# Altium PCB Brainy Modul.PcbDoc (part 1 of 2)
Units mm, origin at the board's own origin, x right, y up, seen from the top; angles counter-clockwise.
Board outline 62.64 x 89.24 mm, 2 copper layers (Top Layer, Bottom Layer), stack 1.569 mm thick; 42 components, 69 nets, 310 pads, 80 vias.
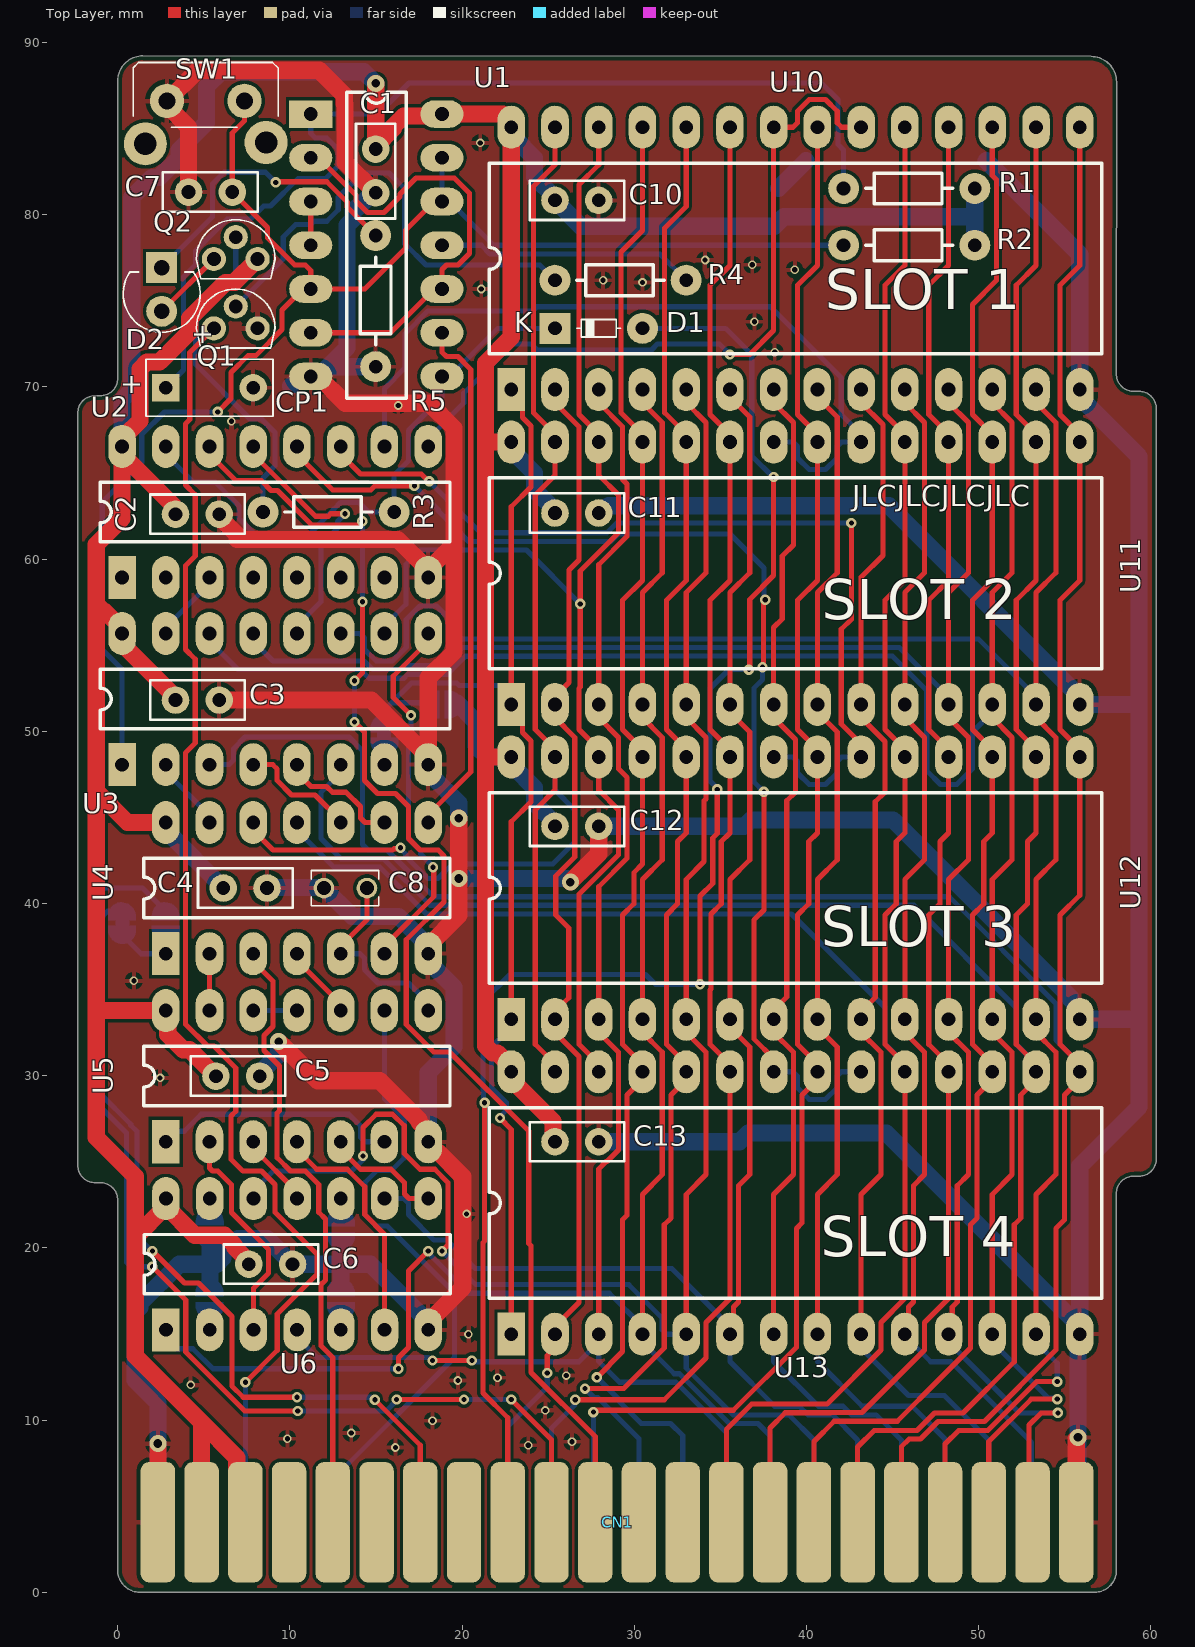
[diagram p0: Top Layer view]
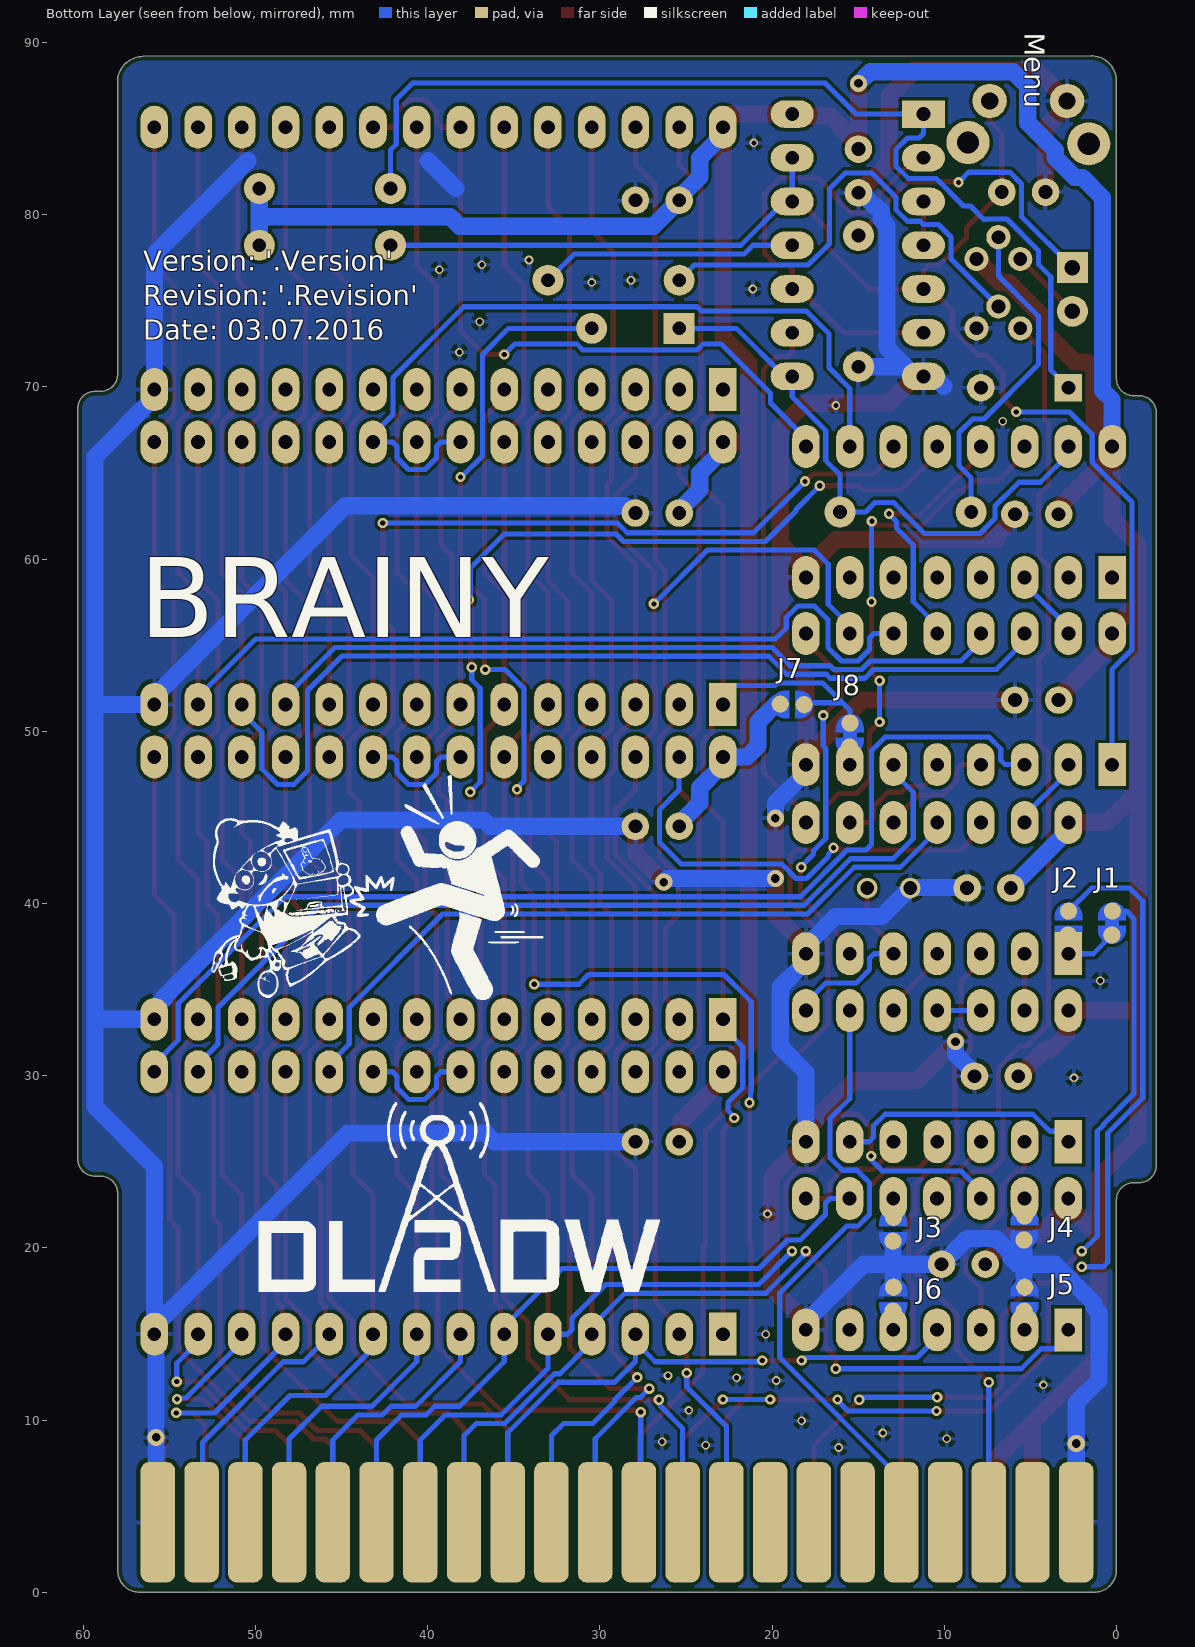
[diagram p1: Bottom Layer view, seen from below]
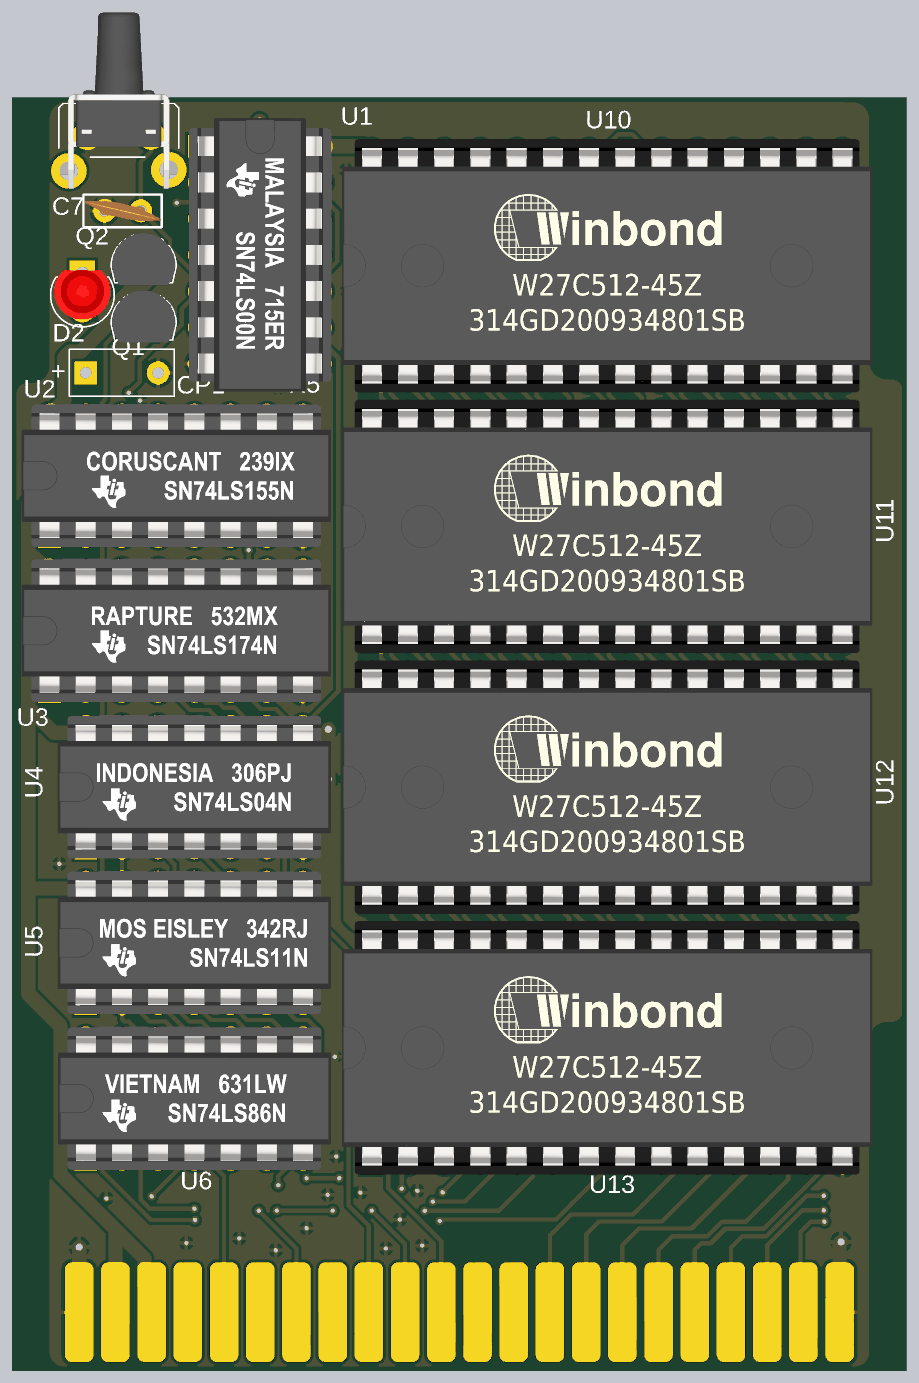
[diagram p2: 3D render of the assembled board from above, using the file's embedded part models]

## Layer stack, top to bottom
Top Solder: solder mask 0.0254, SM-001, Dk 4
Top Layer: signal copper 0.035
Dielectric 1: core 1.4986, Core-043, Dk 4.3
Bottom Layer: signal copper 0.035
Bottom Solder: solder mask 0.0254, SM-001, Dk 4

## Board outline
0,1.29 0,22.785 ccw(c-0.998,22.787) -0.997,23.785 -1.315,23.785 cw(c-1.315,24.785) -2.315,24.785 -2.315,68.494 cw(c-1.315,68.494) -1.315,69.494 -0.997,69.494 ccw(c-0.997,70.491) 0,70.491 0,87.766 cw(c1.47,87.766) 1.47,89.236 56.54,89.197 cw(c56.54,87.724) 58.014,87.724 58.008,70.748 ccw(c59.008,70.748) 59.008,69.748 59.327,69.748 cw(c59.327,68.748) 60.327,68.748 60.327,25.162 cw(c59.327,25.162) 59.327,24.162 59.008,24.162 ccw(c59.008,23.162) 58.008,23.162 58.008,1.265 cw(c56.744,1.264) 56.744,0 1.29,0 cw(c1.29,1.29)

## Design rules (kind name [scope] priority, off if disabled: settings)
BoardOutlineClearance [All] p1: gap=0.254 ignorepadtopadclearanceinfootprint=FALSE
Clearance [All] p1: gap=0.2 ignorepadtopadclearanceinfootprint=TRUE
ComponentClearance ComponentClearance_Sheet [HasFootprint('PCB Title Block DIN A4')] p1: gap=0 collisioncheckmode=3 verticalgap=0 showdistances=FALSE
ComponentClearance [All] p2: gap=0 collisioncheckmode=3 verticalgap=0 showdistances=FALSE
MinimumSolderMaskSliver [All] p1: minsoldermaskwidth=0.103
PolygonConnect [All] p1: connectstyle=Relief reliefconductorwidth=0.254 reliefentries=4 polygonreliefangle="90 Angle" airgapwidth=0.254
RoutingVias RoutingVias_Power [(InNet('VCC') OR InNet('GND') OR InNet('+5V'))] p1: holewidth=0.5 width=1 viastyle="Through Hole" minholewidth=0.5 minwidth=1 maxholewidth=0.8 maxwidth=1.5
RoutingVias [All] p2: holewidth=0.3 width=0.6 viastyle="Through Hole" minholewidth=0.3 minwidth=0.6 maxholewidth=0.5 maxwidth=0.8
SMDNeckDown [All] p1: percent=100.000
SilkToSilkClearance [All] p1: silktosilkclearance=0
SilkToSolderMaskClearance [IsPad] p1: minsilkscreentomaskgap=0 clearancetoexposedcopper=TRUE
SolderMaskExpansion [All] p1: expansion=0.038 istentingtop=FALSE
UnRoutedNet [All] p1: checkbadconnections=TRUE
Width Width_Power [(InNet('VCC') OR InNet('GND') OR InNet('+5V'))] p1: maxlimit=1 minlimit=0.5 preferedwidth=1 checkconnectedcopper=TRUE
Width [All] p2: maxlimit=0.5 minlimit=0.3 preferedwidth=0.3
25 further rules are at their usual default settings.

## Components (designator, comment, footprint, x,y, rotation, side; value= is the part's Value field where it differs from the comment)
C1 "100nF" "CAP Disc 100nF P2.54mm D5.5mm T3mm" 14.986,81.276 r90 top
C2 "100nF" "CAP Disc 100nF P2.54mm D5.5mm T3mm" 5.9,62.611 r180 top
C3 "100nF" "CAP Disc 100nF P2.54mm D5.5mm T3mm" 5.9,51.816 r180 top
C4 "100nF" "CAP Disc 100nF P2.54mm D5.5mm T3mm" 8.674,40.9 r180 top
C5 "100nF" "CAP Disc 100nF P2.54mm D5.5mm T3mm" 8.247,29.974 r180 top
C6 "100nF" "CAP Disc 100nF P2.54mm D5.5mm T3mm" 10.16,19.05 r180 top (schematic designator c6)
C7 "100nF" "CAP Disc 100nF P2.54mm D5.5mm T3mm" 4.119,81.318 r0 top
C8 "220pF" "KERKO 220P 63V RM2.5mm" 11.978,40.894 r90 top
C10 "100nF" "CAP Disc 100nF P2.54mm D5.5mm T3mm" 27.94,80.842 r180 top
C11 "100nF" "CAP Disc 100nF P2.54mm D5.5mm T3mm" 27.94,62.68 r180 top
C12 "100nF" "CAP Disc 100nF P2.54mm D5.5mm T3mm" 27.94,44.482 r180 top
C13 "100nF" "CAP Disc 100nF P2.54mm D5.5mm T3mm" 27.94,26.162 r180 top
CN1 "C64 Expansion Port" "C64 Expansion Port EDGE Connector" 2.337,4.064 r0 top locked
CP1 "10µF" "CAP TAN 10µF T378E106K025AS P5.08mm" 2.794,69.956 r180 top
D1 "1N4148" "1N4148 P=5.08mm" 25.4,73.406 r0 top
D2 "LED Red" "LED 3mm Red Straight" 2.559,76.937 r0 top
J1 "Solder Jumper closed" "Solder Jumper Closed" 0.254,38.862 r270 bottom net-tie
J2 "Solder Jumper Open" "Solder Jumper Open Variant 2" 2.794,38.862 r270 bottom
J3 "Solder Jumper Open" "Solder Jumper Open Variant 2" 12.963,21.082 r90 bottom
J4 "Solder Jumper Open" "Solder Jumper Open Variant 2" 5.35,21.149 r90 bottom
J5 "Solder Jumper Open" "Solder Jumper Open Variant 2" 5.343,17.018 r270 bottom
J6 "Solder Jumper Open" "Solder Jumper Open Variant 2" 12.963,17.018 r270 bottom
J7 "Solder Jumper Open" "Solder Jumper Open Variant 2" 18.834,51.562 r0 bottom
J8 "Solder Jumper closed" "Solder Jumper Closed" 15.494,49.784 r90 bottom net-tie
Q1 "BC547C" BC547C 5.588,73.406 r0 top
Q2 "BC557C" BC557C 5.588,77.432 r0 top
R1 "10k" "10 kOhm R Axial DIN0207 L6.3mm D2.5mm P7.62mm Horizontal" 49.784,81.534 r180 top
R2 "10k" "10 kOhm R Axial DIN0207 L6.3mm D2.5mm P7.62mm Horizontal" 49.784,78.232 r180 top
R3 "10k" "10 kOhm R Axial DIN0207 L6.3mm D2.5mm P7.62mm Horizontal" 16.06,62.738 r180 top
R4 "22k" "22 kOhm R Axial DIN0207 L6.3mm D2.5mm P7.62mm Horizontal" 33.02,76.2 r180 top
R5 "390" "390 Ohm R Axial DIN0207 L6.3mm D2.5mm P7.62mm Horizontal" 14.986,71.178 r90 top
SW1 "Menu" "Tactile Switch Push Button Right Angle L=8.35mm" 2.866,86.614 r180 top
U1 "SN74LS00N" "SN74LS00N with Socket" 11.214,85.852 r270 top
U2 "SN74LS155N" "SN74LS155N with Socket" 0.254,58.928 r0 top
U3 "SN74LS174N" "SN74LS174N with Socket" 0.254,48.064 r0 top
U4 "SN74LS04N" "SN74LS04N with Socket" 2.794,37.084 r0 top
U5 "SN74LS11N" "SN74LS11N with Socket" 2.794,26.162 r0 top
U6 "SN74LS86AN" "SN74LS86N with Socket" 2.803,15.24 r90 top locked
U10 "SLOT 1" "Winbond W27C512-45Z DIP-28 with Socket" 22.86,69.85 r90 top
U11 "SLOT 2" "Winbond W27C512-45Z DIP-28 with Socket" 22.86,51.562 r90 top
U12 "SLOT 3" "Winbond W27C512-45Z DIP-28 with Socket" 22.86,33.274 r90 top
U13 "SLOT 4" "Winbond W27C512-45Z DIP-28 with Socket" 22.86,14.986 r90 top

## Footprints (in the part's own frame and the unit in brackets; to place one, negate y for a bottom-side part, rotate by r counter-clockwise, add the part's x,y. Pads: shape width x height; smd on the part's side, far side on the other; paste and mask are expansions set on the pad)
"1N4148 P=5.08mm" [mm]
  rect 1.8x1.8 hole 0.8: 1(0,0)
  round 1.8 hole 0.8: 2(5.08,0)
  silkscreen extent 1.27,-0.51 3.81,0.51, body extent -0.25,-0.86 5.33,0.86, height 2.02
"10 kOhm R Axial DIN0207 L6.3mm D2.5mm P7.62mm Horizontal" [mm]
  round 1.8 hole 0.8: 1(0,0) 2(7.62,0)
  silkscreen extent 1.27,-0.89 6.35,0.89, body extent -0.27,-1.14 7.9,1.14, height 2.44
"22 kOhm R Axial DIN0207 L6.3mm D2.5mm P7.62mm Horizontal" [mm]
  round 1.8 hole 0.8: 1(0,0) 2(7.62,0)
  silkscreen extent 1.27,-0.89 6.35,0.89, body extent -0.27,-1.14 7.9,1.14, height 2.44
"390 Ohm R Axial DIN0207 L6.3mm D2.5mm P7.62mm Horizontal" [mm]
  round 1.8 hole 0.8: 1(0,0) 2(7.62,0)
  silkscreen extent 1.27,-0.89 6.35,0.89, body extent -0.27,-1.14 7.9,1.14, height 2.44
BC547C [mm]
  round 1.4 hole 0.8: 1(0,0) 2(1.27,1.27) 3(2.54,0)
  silkscreen extent -1.02,-1.14 3.56,2.29, body extent -0.97,-1.34 3.51,2.35, height 7.52
BC557C [mm]
  round 1.4 hole 0.8: 1(0,0) 2(1.27,1.27) 3(2.54,0)
  silkscreen extent -1.02,-1.14 3.56,2.29, body extent -0.97,-1.34 3.51,2.35, height 7.52
"C64 Expansion Port EDGE Connector" [mm] "C64 Expansion Port EDGE Connector"
  rrect50% 2x7 smd paste-1: 1(0,0) 2(2.54,0) 3(5.08,0) 4(7.62,0) 5(10.16,0) 6(12.7,0) 7(15.24,0) 8(17.78,0) 9(20.32,0) 10(22.86,0) 11(25.4,0) 12(27.94,0) 13(30.48,0) 14(33.02,0) 15(35.56,0) 16(38.1,0) 17(40.64,0) 18(43.18,0) 19(45.72,0) 20(48.26,0) 21(50.8,0) 22(53.34,0)
  rrect50% 2x7 smd far side paste-1: A(0,0) B(2.54,0) C(5.08,0) D(7.62,0) E(10.16,0) F(12.7,0) H(15.24,0) J(17.78,0) K(20.32,0) L(22.86,0) M(25.4,0) N(27.94,0) P(30.48,0) R(33.02,0) S(35.56,0) T(38.1,0) U(40.64,0) V(43.18,0) W(45.72,0) X(48.26,0) Y(50.8,0) Z(53.34,0)
"CAP Disc 100nF P2.54mm D5.5mm T3mm" [mm]
  round 1.6 hole 0.8: 1(0,0) 2(2.54,0)
  silkscreen extent -1.49,-1.14 4.01,1.14, body extent -1.49,-0.73 4.01,0.73, height 5.87
"CAP TAN 10µF T378E106K025AS P5.08mm" [mm]
  rect 1.6x1.6 hole 0.8: 1(0,0)
  round 1.6 hole 0.8: 2(-5.08,0)
  silkscreen extent -6.22,-1.65 1.14,1.65, body extent -5.9,-1.66 0.82,1.66, height 8.17
"KERKO 220P 63V RM2.5mm" [mm]
  round 1.2 hole 0.8: 1(0,0) 2(0,-2.5)
  silkscreen extent -1.03,-3.19 1.03,0.74, body extent -1.03,-3.19 1.03,0.74, height 4.75
"LED 3mm Red Straight" [mm]
  rect 1.8x1.8 hole 0.9: 1(0,0)
  round 1.8 hole 0.9: 2(0,-2.54)
  silkscreen extent -2.24,-3.76 2.24,-0.25, body extent -2,-3.27 2,0.23, height 6
"SN74LS00N with Socket" [mm]
  rect 1.6x2.5 hole 0.8: 1(0,0)
  oval 1.6x2.5 hole 0.8: 2(2.54,0) 3(5.08,0) 4(7.62,0) 5(10.16,0) 6(12.7,0) 7(15.24,0) 8(15.24,7.62) 9(12.7,7.62) 10(10.16,7.62) 11(7.62,7.62) 12(5.08,7.62) 13(2.54,7.62) 14(0,7.62)
  silkscreen extent -1.27,2.08 16.51,5.54, body extent -1.97,-1.19 17.21,8.86, height 7.91
"SN74LS04N with Socket" [mm]
  rect 1.6x2.5 hole 0.8: 1(0,0)
  oval 1.6x2.5 hole 0.8: 2(2.54,0) 3(5.08,0) 4(7.62,0) 5(10.16,0) 6(12.7,0) 7(15.24,0) 8(15.24,7.62) 9(12.7,7.62) 10(10.16,7.62) 11(7.62,7.62) 12(5.08,7.62) 13(2.54,7.62) 14(0,7.62)
  silkscreen extent -1.27,2.08 16.51,5.54, body extent -1.97,-1.19 17.21,8.86, height 7.91
"SN74LS11N with Socket" [mm]
  rect 1.6x2.5 hole 0.8: 1(0,0)
  oval 1.6x2.5 hole 0.8: 2(2.54,0) 3(5.08,0) 4(7.62,0) 5(10.16,0) 6(12.7,0) 7(15.24,0) 8(15.24,7.62) 9(12.7,7.62) 10(10.16,7.62) 11(7.62,7.62) 12(5.08,7.62) 13(2.54,7.62) 14(0,7.62)
  silkscreen extent -1.27,2.08 16.51,5.54, body extent -1.97,-1.19 17.21,8.86, height 7.91
"SN74LS86N with Socket" [mm]
  rect 2.5x1.6 hole 0.8: 1(0,0)
  oval 2.5x1.6 hole 0.8: 2(0,-2.54) 3(0,-5.08) 4(0,-7.62) 5(0,-10.16) 6(0,-12.7) 7(0,-15.24) 8(7.62,-15.24) 9(7.62,-12.7) 10(7.62,-10.16) 11(7.62,-7.62) 12(7.62,-5.08) 13(7.62,-2.54) 14(7.62,0)
  silkscreen extent 2.08,-16.51 5.54,1.27, body extent -1.19,-17.21 8.86,1.97, height 7.91
"SN74LS155N with Socket" [mm]
  rect 1.6x2.5 hole 0.8: 1(0,0)
  oval 1.6x2.5 hole 0.8: 2(2.54,0) 3(5.08,0) 4(7.62,0) 5(10.16,0) 6(12.7,0) 7(15.24,0) 8(17.78,0) 9(17.78,7.62) 10(15.24,7.62) 11(12.7,7.62) 12(10.16,7.62) 13(7.62,7.62) 14(5.08,7.62) 15(2.54,7.62) 16(0,7.62)
  silkscreen extent -1.27,2.08 19.05,5.54, body extent -1.97,-1.19 19.75,8.86, height 7.81
"SN74LS174N with Socket" [mm]
  rect 1.6x2.5 hole 0.8: 1(0,0)
  oval 1.6x2.5 hole 0.8: 2(2.54,0) 3(5.08,0) 4(7.62,0) 5(10.16,0) 6(12.7,0) 7(15.24,0) 8(17.78,0) 9(17.78,7.62) 10(15.24,7.62) 11(12.7,7.62) 12(10.16,7.62) 13(7.62,7.62) 14(5.08,7.62) 15(2.54,7.62) 16(0,7.62)
  silkscreen extent -1.27,2.08 19.05,5.54, body extent -1.97,-1.19 19.75,8.86, height 7.81
"Solder Jumper Closed" [mm]
  round 1 smd paste-1 mask-1: 1(-0.695,0.016) 2(0.695,-0.016)
  Top Layer region: -0.165,-0.804 -0.378,-0.804 -0.695,-0.741 -0.964,-0.561 -1.143,-0.292 -1.206,0.025 -1.206,0.025 -1.147,0.323 -0.978,0.576 -0.725,0.745 -0.427,0.804 -0.427,0.804 -0.165,0.804
  Top Layer region: 0.165,0.804 0.378,0.804 0.695,0.741 0.964,0.561 1.143,0.292 1.207,-0.025 1.207,-0.025 1.147,-0.323 0.978,-0.576 0.725,-0.745 0.427,-0.804 0.427,-0.804 0.165,-0.804
  Top Layer region: 0.195,-0.406 -0.643,-0.406 -0.643,0.374 0.195,0.374
"Solder Jumper Open Variant 2" [mm]
  round 1 smd paste-1 mask-1: 1(-0.695,0.016) 2(0.695,-0.016)
  Top Layer region: 0.165,0.804 0.378,0.804 0.695,0.741 0.964,0.561 1.143,0.292 1.207,-0.025 1.207,-0.025 1.147,-0.323 0.978,-0.576 0.725,-0.745 0.427,-0.804 0.427,-0.804 0.165,-0.804
  Top Layer region: -0.165,-0.804 -0.378,-0.804 -0.695,-0.741 -0.964,-0.561 -1.143,-0.292 -1.206,0.025 -1.206,0.025 -1.147,0.323 -0.978,0.576 -0.725,0.745 -0.427,0.804 -0.427,0.804 -0.165,0.804
"Tactile Switch Push Button Right Angle L=8.35mm" [mm] "Tactile Switch SPST-NO Side Actuated Through Hole, Right Angle 1-1825027-1"
  round 2 hole 1: 1(0,0) 2(-4.5,0)
  round 2.5 hole 1.3: 3(1.255,2.49) 4(-5.755,2.413)
  silkscreen extent -6.45,-2.24 1.96,1.52, body extent -6.45,-8.61 1.96,3.75, height 7.06
"Winbond W27C512-45Z DIP-28 with Socket" [mm]
  rect 2.5x1.6 hole 0.8: 1(0,0)
  oval 2.5x1.6 hole 0.8: 2(0,-2.54) 3(0,-5.08) 4(0,-7.62) 5(0,-10.16) 6(0,-12.7) 7(0,-15.24) 8(0,-17.78) 9(0,-20.32) 10(0,-22.86) 11(0,-25.4) 12(0,-27.94) 13(0,-30.48) 14(0,-33.02) 15(15.24,-33.02) 16(15.24,-30.48) 17(15.24,-27.94) 18(15.24,-25.4) 19(15.24,-22.86) 20(15.24,-20.32) 21(15.24,-17.78) 22(15.24,-15.24) 23(15.24,-12.7) 24(15.24,-10.16) 25(15.24,-7.62) 26(15.24,-5.08) 27(15.24,-2.54) 28(15.24,0)
  silkscreen extent 2.08,-34.29 13.16,1.27, body extent -1.27,-35.11 16.51,2.1, height 8.64

## Part data
C1 C2 C3 C4 C5 C6 C7 C10 C11 C12 C13: library part CMP-Capacitors-Ceramic_Capacitors-00007-4, "Ceramic Disc Capacitors 100nF -20%~+80% 50V Through Hole,P=2.54mm RoHS", ComponentLink1URL=https://lcsc.com/product-detail/Others_Dersonic-CC1H104ZA1PD3F5O3000_C353909.html
C8: library part CMP-Capacitors-Ceramic_Capacitors-00015-1, "Keramischer Scheibenkondensator, bedrahtet. Für Printmontage, Rastermaß 2,5 mm.", Case/Package=Radial, Dielectric=C0G, Max Operating Temperature=125°C, Min Operating Temperature=-55°C, Package Quantity=3500, Tolerance=10%, Voltage Rating=63V, Capacitance=220pF, Height=5, Height - Seated (Max)=5mm, Lead Diameter=4mm, Lead Pitch=2.5mm, Lead/Base Style=Straight, Length=0.15inch, Mount="Through Hole", Number of Pins=2, Packaging="Tape and Reel", REACH SVHC="No SVHC", Termination=Radial, Thickness=2.2mm, Voltage Rating (DC)=63V, Width=4mm
CN1: library part CMP-Commodore-00008-4, "Expansion Port EDGE Connector for Interface Cards"
CP1: library part CMP-Capacitors-Tantalum_Capacitors-00001-5, "Tantalum Capacitors - Solid Leaded 25volts 10uF 10%", Capacitance=10uF, Case/Package=Molded, ESR (Equivalent Series Resistance)=2.5R, Leakage Current=3uA, Max Operating Temperature=125°C, Min Operating Temperature=-55°C, Tolerance=10%, Voltage Rating=25V, Depth=3.3mm, Dissipation Factor=6%, Height=3.3mm, Lead Pitch=5.08mm, Length=7.87mm, Packaging=Bulk, Polarity=Polar, Termination=Radial, Voltage Rating (DC)=25V, Width=5.84mm
D1: library part CMP-Diodes-00002-4, "NEXPERIA - 1N4148 - DIODE, 1N4148 AMMO-BOX 10K", Capacitance=4pF, Case/Package=SOD, Current=4A, Current Rating=200mA, Forward Voltage=1V, Max Operating Temperature=200°C, Max Power Dissipation=500mW, Max Repetitive Reverse Voltage (Vrrm)=100V, Min Operating Temperature=-65°C, Element Configuration=Single, Forward Current=200mA, Height=0.25inch, Lead Free="Lead Free", Length=2.5inch, Max Forward Surge Current (Ifsm)=4A, Number of Pins=2, Output Current=200mA, Packaging="Ammo Pack", Peak Non-Repetitive Surge Current=4A, Polarity=Standard, Radiation Hardening=No, REACH SVHC="No SVHC", Reverse Recovery Time=4ns, Termination=Axial, Voltage=100V, Voltage Rating (DC)=100V, Weight=0.01lb, Width=0.25inch
D2: library part CMP-LEDs-00000-4, "WURTH ELEKTRONIK   151033RS03000   LED, 3MM,  RED, 2600MCD, 621NM", Case/Package=Radial, Color=Red, Forward Current=30mA, Forward Voltage=2V, Max Operating Temperature=85°C, Min Operating Temperature=-40°C, Package Quantity=1, Test Current=20mA, Dominant Wavelength=621nm, Height=5.55mm, Lens Size=3mm, Lens Style=Clear,Circular,Round, Luminous Intensity=2600mcd, Mount="Through Hole", Packaging=Bulk, REACH SVHC=Unknown, Viewing Angle=30°, Wavelength=621nm
J1 J8: library part CMP-Mechanicals-00017-7, "Solder Jumper Closed"
J2 J3 J4 J5 J6 J7: library part CMP-Mechanicals-00016-14
Q1: library part CMP-Transistors-00002-1, "BC547C Diotec Bipolar NPN Transistor 45V", Case/Package=TO-92, Collector Base Voltage (VCBO)=50V, Collector Emitter Saturation Voltage=600mV, Collector Emitter Voltage (VCEO)=45V, Emitter Base Voltage (VEBO)=5V, Frequency=300MHz, Max Operating Temperature=150°C, Min Operating Temperature=-55°C, Power Dissipation=500mW, Mount="Through Hole", Number of Channels=1, Number of Elements=1, Number of Pins=3, Packaging="Tape and Reel", Polarity=NPN
Q2: library part CMP-Transistors-00003-1, "Trans GP BJT PNP 45V 0.1A Automotive 3-Pin TO-92 T/R", Case/Package=TO-92, Collector Base Voltage (VCBO)=50V, Collector Emitter Voltage (VCEO)=45V, Emitter Base Voltage (VEBO)=5V, Frequency=150MHz, Max Operating Temperature=150°C, Min Operating Temperature=-55°C, Power Dissipation=500mW, Mount="Through Hole", Number of Elements=1, Number of Pins=3, Packaging="Tape and Reel", Polarity=PNP
R1 R2 R3: library part CMP-Resistors-Yageo_THT_DIN_0207-00096-1, "RES 10K OHM 1/4W 5% AXIAL", Case/Package=Axial, Max Operating Temperature=155°C, Max Power Dissipation=250mW, Min Operating Temperature=-55°C, Package Quantity=200, Resistance=10kR, Temperature Coefficient=500ppm/°C, Tolerance=5%, Composition="Carbon Film", Lead Free="Lead Free", Length=0.248inch, Number of Terminations=2, Packaging=Bulk
R4: library part CMP-Resistors-Yageo_THT_DIN_0207-00104-1, "RES 22K OHM 1/4W 5% AXIAL", Case/Package=Axial, Max Operating Temperature=155°C, Max Power Dissipation=250mW, Min Operating Temperature=-55°C, Package Quantity=200, Resistance=22kR, Temperature Coefficient=500ppm/°C, Tolerance=5%, Composition="Carbon Film", Length=0.248inch, Number of Terminations=2, Packaging=Bulk
R5: library part CMP-Resistors-Yageo_THT_DIN_0207-00062-1, "RES 390 OHM 1/4W 5% AXIAL", Case/Package=Axial, Max Operating Temperature=155°C, Max Power Dissipation=250mW, Min Operating Temperature=-55°C, Package Quantity=200, Resistance=390R, Temperature Coefficient=500ppm/°C, Tolerance=5%, Composition="Carbon Film", Lead Free="Lead Free", Length=0.248inch, Number of Terminations=2, Packaging=Bulk, Power Rating=250mW
SW1: library part CMP-Switches-00004-1, "SWITCH TACTILE SPST-NO 0.05A 24V", Contact Current Rating=50mA, Contact Resistance=100mR, Illumination Color=Black, Max Operating Temperature=85°C, Max Voltage Rating (DC)=24V, Min Operating Temperature=-35°C, Operating Force=160gf, Package Quantity=1000, Actuator Length=0.226inch, Actuator Material=PBT, Actuator Type=Standard, Contact Material="Copper Alloy", Contact Plating=Silver, Depth=12.36mm, Electrical Life=100000Cycles, ELV=Compliant, Height=7.3mm, Illumination Type=Non-Illuminated, Lead Free="Lead Free", Length=7.11mm, Max Current Rating=50mA, Mechanical Life=100000Cycles, Mount="Through Hole", Orientation=Straight, Packaging="Loose Piece", Radiation Hardening=No, Switch Function=Off-Mom, Switch Travel=0.25mm, Termination="PC Pins", Throw Configuration=SPST, Type=Switch, Width=6mm
U1: library part CMP-ICs-74xx-series-00000-3, "IC, 74LS, 74LS00, DIP14, 5.25V", Case/Package=PDIP, High Level Output Current=-400uA, Low Level Output Current=8mA, Max Operating Temperature=70°C, Max Supply Voltage=5.25V, Min Operating Temperature=0°C, Min Supply Voltage=4.75V, Operating Supply Voltage=5V, Output Current=16mA, Package Quantity=25, Quiescent Current=2.4mA, Contact Plating=Gold, Height=4.57mm, Lead Free="Lead Free", Length=19.3mm, Logic Function=NAND, Mount="Through Hole", Number of Bits=4, Number of Circuits=4, Number of Elements=4, Number of Gates=4, Number of Input Lines=2, Number of Inputs=2, Number of Output Lines=1, Number of Outputs=1, Number of Pins=14, Packaging=Rail/Tube, Propagation Delay=15ns, Radiation Hardening=No, REACH SVHC="No SVHC", Schmitt Trigger Input=No, Turn-On Delay Time=15ns, Weight=0.032734oz, Width=6.35mm
U2: library part CMP-ICs-74xx-series-00058-1, "Decoder/Demultiplexer Single/Dual 3/2-to-8/4 16-Pin PDIP", Case/Package=PDIP, High Level Output Current=-100uA, Low Level Output Current=8mA, Max Operating Temperature=70°C, Max Supply Voltage=5.25V, Min Operating Temperature=0°C, Min Supply Voltage=4.75V, Operating Supply Voltage=5V, Mount="Through Hole", Number of Pins=16, Polarity=Inverting, Propagation Delay=51ns
U3: library part CMP-ICs-74xx-series-00057-1, "Flip Flop D-Type Bus Interface Pos-Edge 1-Element 16-Pin PDIP Tube", Case/Package=PDIP, Frequency=40MHz, High Level Output Current=-400uA, Low Level Output Current=8mA, Max Operating Temperature=70°C, Max Supply Voltage=5.25V, Min Operating Temperature=0°C, Min Supply Voltage=4.75V, Operating Supply Voltage=5V, Package Quantity=25, Clock Edge Trigger Type="Positive Edge", Height=4.57mm, Lead Free="Lead Free", Length=19.3mm, Logic Function=D-Type,Flip-Flop, Max Frequency=40MHz, Mount="Through Hole", Number of Bits=6, Number of Bits per Element=6, Number of Circuits=7, Number of Elements=1, Number of Input Lines=2, Number of Output Lines=2, Number of Pins=16, Output Current=8mA, Output Type=TTL, Packaging=Rail/Tube, Polarity=Non-Inverting, Propagation Delay=30ns, Radiation Hardening=No, REACH SVHC="No SVHC", Turn-On Delay Time=20ns, Weight=0.03357oz, Width=6.35mm
U4: library part CMP-ICs-74xx-series-00006-2, "IC HEX INVERTER 14-DIP", Case/Package=PDIP, High Level Output Current=-400uA, Low Level Output Current=8mA, Max Operating Temperature=70°C, Max Supply Voltage=5.25V, Min Operating Temperature=0°C, Min Supply Voltage=4.75V, Nominal Supply Current=100uA, Operating Supply Voltage=5V, Package Quantity=25, Contact Plating=Gold, Height=4.57mm, Lead Free="Lead Free", Length=19.3mm, Logic Function=Buffer,Inverter, Max Output Current=8mA, Mount="Through Hole", Number of Bits=6, Number of Circuits=6, Number of Elements=6, Number of Gates=6, Number of Inputs=1, Number of Output Lines=6, Number of Pins=14, Output Current=8mA, Packaging=Rail/Tube, Propagation Delay=15ns, Radiation Hardening=No, REACH SVHC="No SVHC", Schmitt Trigger Input=No, Termination="Through Hole", Turn-On Delay Time=22ns, Weight=0.032734oz, Width=6.35mm
U5: library part CMP-ICs-74xx-series-00011-2, "IC GATE AND 3CH 3-INP 14DIP", Case/Package=PDIP, High Level Output Current=-400uA, Low Level Output Current=8mA, Max Operating Temperature=70°C, Max Supply Voltage=5.25V, Min Operating Temperature=0°C, Min Supply Voltage=4.75V, Operating Supply Voltage=5V, Package Quantity=25, Quiescent Current=3.3mA, Height=4.57mm, Lead Free="Lead Free", Length=19.3mm, Logic Function=AND, Max Output Current=8mA, Mount="Through Hole", Number of Bits=3, Number of Circuits=3, Number of Elements=3, Number of Gates=3, Number of Input Lines=3, Number of Inputs=3, Number of Output Lines=1, Number of Outputs=1, Number of Pins=14, Output Current=8mA, Packaging=Rail/Tube, Propagation Delay=20ns, Radiation Hardening=No, REACH SVHC="No SVHC", Schmitt Trigger Input=No, Termination="Through Hole", Turn-On Delay Time=20ns, Weight=0.032734oz, Width=6.35mm
U6: library part CMP-ICs-74xx-series-00039-2, "IC GATE XOR 4CH 2-INP 14-DIP", Case/Package=PDIP, High Level Output Current=-400uA, Low Level Output Current=8mA, Max Operating Temperature=70°C, Max Supply Voltage=5.25V, Min Operating Temperature=0°C, Min Supply Voltage=4.75V, Operating Supply Voltage=5V, Package Quantity=25, Quiescent Current=6.1mA, Contact Plating=Gold, Height=4.57mm, Lead Free="Lead Free", Length=19.3mm, Logic Function=XOR,OR, Mount="Through Hole", Number of Bits=4, Number of Circuits=4, Number of Elements=4, Number of Gates=4, Number of Input Lines=2, Number of Inputs=2, Number of Output Lines=1, Number of Outputs=1, Number of Pins=14, Output Current=8mA, Packaging=Rail/Tube, Propagation Delay=30ns, Radiation Hardening=No, REACH SVHC="No SVHC", Schmitt Trigger Input=No, Turn-On Delay Time=30ns, Weight=0.032734oz, Width=6.35mm
U10 U11 U12 U13: library part CMP-ICs-Memory-00001-2, "IC EEPROM 512KBIT 45NS 28DIP", Case/Package=DIP, Frequency=45GHz, Max Operating Temperature=70°C, Min Operating Temperature=0°C, Operating Supply Voltage=5V, Package Quantity=15, Access Time=45ns, Density=512Kb, Interface=Parallel, Lead Free="Lead Free", Memory Size=512000B, Memory Type=EEPROM, Number of Pins=28, Packaging=Rail/Tube, Radiation Hardening=No

## Via types
v1: diameter 0.6, hole 0.3, Top Layer to Bottom Layer, tented both sides, 47 vias
v2: diameter 0.5, hole 0.3, Top Layer to Bottom Layer, tented both sides, 26 vias
v3: diameter 1, hole 0.5, Top Layer to Bottom Layer, tented both sides, 7 vias

## Nets (pads, with @x,y where several pads share a name; then routed paths per layer and width w, separated by ;. In a path a pad name is that pad's centre, name@x,y a point inside that pad or via, vN(x,y) a via of type N, cw(c..) or ccw(c..) an arc to the next point about the centre after c; other vN are vias at no path point)
\E\X\R\O\M\: CN1.9 D1.2 | length 91.3
  Top Layer w0.3: v1(21.315,28.427) 21.315,20.39 21.224,20.299 21.224,11.563 22.657,10.13 CN1.9 ; v1(33.82,35.306) 33.82,40.428 34.56,41.168 34.56,43.803 34.82,44.063 v1(34.82,46.631) ; v1(36.662,53.586) 36.71,53.634 36.71,57.655 38.1,59.045 v1(38.1,64.77)
  Bottom Layer w0.3: v1(21.315,28.427) 21.257,28.484 21.257,29.045 21.21,29.093 21.21,34.29 22.794,35.874 30.663,35.874 31.231,35.306 v1(33.82,35.306) ; D1.2 35.306,73.406 36.83,71.882 36.83,65.996 38.056,64.77 v1(38.1,64.77) ; v1(34.82,46.631) 34.82,46.702 34.41,47.112 34.41,52.488 35.516,53.594 36.653,53.594 v1(36.662,53.586)
\I\/\O\1\: CN1.7 J1.1 | length 49.1
  Top Layer w0.3: v1(2.016,19.812) 2.031,19.812 3.882,17.96 4.699,17.96 6.647,16.012 6.647,11.967 7.289,11.325 v1(10.415,11.325) ; v1(14.937,11.176) 17.577,8.536 CN1.7
  Bottom Layer w0.3: J1.1 -0.575,39.557 -1.024,39.108 -1.024,28.964 0.762,27.178 0.762,27.123 1.116,26.77 1.116,20.68 1.983,19.812 v1(2.016,19.812) ; v1(10.415,11.325) 14.707,11.325 14.856,11.176 v1(14.937,11.176)
\I\/\O\2\: CN1.10 J2.1 | length 63.1
  Top Layer w0.3: v1(2.016,18.907) 3.953,16.971 3.953,13.954 7.381,10.526 v1(10.457,10.526) ; v1(16.204,11.19) v1(20.117,11.19) ; v1(22.86,11.19) 25.197,8.853 CN1.10
  Bottom Layer w0.3: v1(2.016,18.907) 0.764,18.907 0.508,19.163 0.508,19.943 0.508,26.67 -1.524,28.702 -1.524,40.132 -0.762,40.894 1.441,40.894 J2.1 ; v1(10.457,10.526) 15.595,10.526 16.204,11.135 v1(16.204,11.19) ; v1(20.117,11.19) v1(22.86,11.19)
\R\E\S\E\T\: CN1.C Q1.1 | length 76.9
  Top Layer w0.3: Q1.1 4.188,72.006 4.188,68.104 3.944,67.86 3.944,64.303 4.51,63.737 4.51,60.18 3.944,59.614 3.944,54.748 4.51,54.182 4.51,49.316 3.944,48.75 3.944,32.988 5.213,31.719 5.588,31.719 6.857,30.45 6.857,27.934 6.585,27.662 6.585,25.146 7.271,24.46 8.359,24.46 9.144,23.675 9.144,22.062 11.573,19.634 11.573,18.466 9.273,16.166 9.273,14.048 v1(7.417,12.192)
  Bottom Layer w0.3: CN1.C v1(7.417,12.192)
\R\O\M\L\: CN1.11 U2.14 | length 78.8
  Top Layer w0.3: U2.14 5.334,66.098 6.879,64.553 8.345,64.553 8.91,63.988 9.277,63.988 11.277,61.988 13.97,61.988 14.183,62.201 v1(14.204,62.201) ; v1(13.754,50.546) 14.344,49.956 14.344,47.138 15.098,46.384 16.13,46.384 16.884,45.63 16.884,43.778 17.558,43.104 18.618,43.104 18.962,42.76 18.962,40.088 16.764,37.89 16.764,32.976 18.361,31.379 19.282,31.379 23.876,26.785 23.876,20.255 24.01,20.121 24.01,12.762 27.737,9.036 CN1.11 ; v1(13.754,52.934) 14.224,53.404 v1(14.224,57.524)
  Bottom Layer w0.3: v1(13.754,50.546) v1(13.754,52.934) ; v1(14.204,62.201) 14.224,62.182 v1(14.224,57.524)
A0: CN1.Y U10.10 U11.10 U12.10 U13.10 | length 72.4
  Top Layer w0.3: U13.10 45.931,15.197 45.931,16.566 46.22,16.855 46.22,23.604 46.87,24.254 46.87,31.359 45.72,32.509 U12.10 45.72,41.392 46.87,42.542 46.87,49.647 45.72,50.797 U11.10 45.72,58.061 46.87,59.211 46.87,67.935 45.72,69.085 U10.10
  Bottom Layer w0.3: U13.10 45.72,14.888 47.222,13.386 48.394,13.386 53.086,8.694 53.086,4.115 CN1.Y
A1: CN1.X U10.9 U11.9 U12.9 U13.9 | length 73.2
  Top Layer w0.3: U13.9 43.18,23.104 44.33,24.254 44.33,31.359 43.18,32.509 U12.9 43.18,33.724 43.999,34.543 43.999,45.911 44.57,46.482 44.57,49.407 43.18,50.797 43.18,58.948 44.45,60.218 44.45,67.815 43.18,69.085 U10.9
  Bottom Layer w0.3: U13.9 43.18,14.186 45.936,11.43 48.006,11.43 50.597,8.839 CN1.X
A2: CN1.W U10.8 U11.8 U12.8 U13.8 | length 73.4
  Top Layer w0.3: U13.8 40.64,23.104 41.79,24.254 41.79,31.674 40.64,32.824 U12.8 40.64,41.392 41.79,42.542 41.79,49.962 40.64,51.112 U11.8 40.64,58.061 41.79,59.211 41.79,68.25 40.64,69.4 U10.8
  Bottom Layer w0.3: U13.8 40.64,13.406 43.244,10.802 46.153,10.802 48.057,8.898 CN1.W
A3: CN1.V U10.7 U11.7 U12.7 U13.7 | length 73.5
  Top Layer w0.3: U13.7 38.1,23.104 39.25,24.254 39.25,31.359 38.1,32.509 U12.7 38.1,33.803 38.859,34.563 38.859,45.971 39.37,46.482 39.37,49.527 38.1,50.797 38.1,56.022 38.6,56.522 38.6,60.18 39.25,60.83 39.25,67.935 38.1,69.085 U10.7
  Bottom Layer w0.3: U13.7 38.1,13.406 40.704,10.802 42.129,10.802 42.629,10.302 44.054,10.302 45.517,8.839 CN1.V
A4: CN1.U U6.9 U10.6 U11.6 U12.6 U13.6 | length 97.4
  Top Layer w0.3: U13.6 35.771,15.197 35.771,16.566 36.06,16.855 36.06,23.604 36.71,24.254 36.71,31.674 35.56,32.824 U12.6 35.56,41.392 36.71,42.542 36.71,49.962 35.56,51.112 U11.6 35.56,58.061 36.71,59.211 36.71,68.25 35.56,69.4 U10.6
  Bottom Layer w0.3: U6.9 16.633,22.86 16.893,22.6 16.893,21.934 18.364,20.462 19.112,20.462 20.765,18.809 32.187,18.809 35.56,15.436 U13.6 35.56,13.406 38.164,10.802 39.589,10.802 40.089,10.302 41.514,10.302 42.977,8.839 CN1.U
A5: CN1.T U6.12 U10.5 U11.5 U12.5 U13.5 | length 111.6
  Top Layer w0.3: v1(14.25,25.336) 14.25,26.994 15.018,27.762 15.97,27.762 16.644,27.088 16.644,25.476 17.558,24.562 18.417,24.562 19.193,23.786 19.193,20.162 v1(18.843,19.812) ; U13.5 33.02,23.104 34.17,24.254 34.17,31.359 33.02,32.509 U12.5 33.02,41.392 34.06,42.432 34.06,45.966 34.17,46.076 34.17,49.647 33.02,50.797 33.02,58.061 34.17,59.211 34.17,67.935 33.02,69.085 U10.5
  Bottom Layer w0.3: U6.12 7.883,23.31 9.033,24.46 13.588,24.46 14.25,25.121 v1(14.25,25.336) ; v1(18.843,19.812) 20.793,17.862 29.68,17.862 31.63,15.912 31.63,15.246 31.89,14.986 U13.5 33.02,13.013 35.731,10.302 38.974,10.302 40.437,8.839 CN1.T
A6: CN1.S U6.1 U10.4 U11.4 U12.4 U13.4 | length 109.9
  Top Layer w0.3: v1(16.303,12.975) 16.303,13.625 16.893,14.215 16.893,18.662 v1(18.043,19.812) ; U13.4 30.48,23.104 31.63,24.254 31.63,31.359 30.48,32.509 U12.4 30.48,41.392 31.63,42.542 31.63,49.647 30.48,50.797 U11.4 30.48,58.061 31.63,59.211 31.63,67.935 30.48,69.085 U10.4
  Bottom Layer w0.3: U6.1 2.803,14.79 3.453,14.14 4.366,14.14 5.531,12.975 v1(16.303,12.975) ; v1(18.043,19.812) 18.043,19.731 18.193,19.581 18.193,19.543 20.373,17.362 28.554,17.362 30.48,15.436 U13.4 30.48,14.536 32.324,12.692 32.634,12.692 35.524,9.802 37.183,9.802 37.897,9.088 CN1.S
A7: CN1.R U6.4 U10.3 U11.3 U12.3 U13.3 | length 93.5
  Top Layer w0.3: v1(18.288,13.462) v1(20.574,13.462) ; U13.3 27.94,24.583 28.369,25.012 28.416,25.012 29.09,25.686 29.09,31.359 27.94,32.509 27.94,40.979 29.59,42.629 29.59,47.328 29.09,47.828 29.09,49.647 27.94,50.797 27.94,59.68 29.59,61.33 29.59,64.364 29.33,64.624 29.33,67.695 27.94,69.085 U10.3
  Bottom Layer w0.3: U6.4 10.423,14.79 11.588,13.625 18.06,13.625 18.223,13.462 v1(18.288,13.462) ; v1(20.574,13.462) 20.655,13.462 20.731,13.386 26.79,13.386 U13.3@27.94,14.536 ; U13.3 U13.3@27.94,14.536 ; CN1.R 35.357,9.262 32.427,12.192 29.154,12.192 27.94,13.406 U13.3@27.94,14.536
A8: CN1.P U10.25 U11.25 U12.25 U13.25 | length 88.1
  Top Layer w0.3: v1(27.833,12.476) 29.33,13.973 29.33,21.63 29.59,21.89 29.59,28.886 30.48,29.776 U13.25 30.48,30.676 29.33,31.826 29.33,39.331 29.98,39.981 29.98,41.788 30.48,42.288 30.48,48.964 29.33,50.114 29.33,57.619 30.48,58.769 U11.25 30.48,67.252 29.23,68.502 29.23,77.839 30.48,79.089 U10.25
  Bottom Layer w0.3: v1(27.833,12.476) 29.152,11.157 29.152,11.064 30.414,9.802 32.108,9.802 32.817,9.093 CN1.P
A9: CN1.N U10.24 U11.24 U12.24 U13.24 | length 89.2
  Top Layer w0.3: v1(27.14,11.826) 29.396,11.826 31.75,14.18 31.75,21.345 32.13,21.725 32.13,28.886 33.02,29.776 U13.24 33.02,30.676 31.87,31.826 31.87,39.331 32.52,39.981 32.52,43.596 33.02,44.096 33.02,48.964 31.87,50.114 31.87,57.619 33.02,58.769 U11.24 33.02,67.252 31.77,68.502 31.77,79.236 33.02,80.486 U10.24
  Bottom Layer w0.3: v1(27.14,11.826) 27.663,11.303 27.89,11.303 30.277,8.916 CN1.N
A10: CN1.M U10.21 U11.21 U12.21 U13.21 | length 94
  Top Layer w0.3: v1(27.628,10.46) 27.709,10.46 27.818,10.569 35.759,10.569 39.422,14.231 39.422,21.133 39.75,21.461 39.75,28.886 40.64,29.776 U13.21 40.64,30.676 39.49,31.826 39.49,39.331 40.14,39.981 40.14,43.596 40.64,44.096 40.64,48.964 39.49,50.114 39.49,57.619 40.64,58.769 U11.21 40.64,67.252 39.49,68.402 39.49,75.907 40.64,77.057 U10.21
  Bottom Layer w0.3: v1(27.628,10.46) 27.628,4.173 CN1.M
A11: CN1.L U10.23 U11.23 U12.23 U13.23 | length 91.2
  Top Layer w0.3: v1(26.576,11.176) 31.75,11.176 34.17,13.596 34.17,15.672 35.56,17.062 35.56,30.676 34.41,31.826 34.41,34.977 34.47,35.037 34.47,39.391 35.06,39.981 35.06,43.596 35.56,44.096 35.56,48.964 34.41,50.114 34.41,57.619 35.56,58.769 U11.23 35.56,67.252 34.41,68.402 34.41,75.907 35.56,77.057 U10.23
  Bottom Layer w0.3: CN1.L 25.197,7.895 25.197,9.524 26.519,10.845 26.519,11.119 v1(26.576,11.176)
A12: CN1.K U10.2 U11.2 U12.2 U13.2 | length 70.8
  Top Layer w0.3: v1(24.956,12.736) 24.956,13.74 25.4,14.184 25.4,15.436 26.79,16.826 26.79,31.119 25.4,32.509 25.4,33.724 26.199,34.523 26.199,38.574 25.446,39.327 25.446,41.596 26.55,42.7 26.55,49.647 25.4,50.797 25.4,52.012 26.219,52.831 26.219,59.374 26.79,59.945 26.79,67.695 25.4,69.085 U10.2
  Bottom Layer w0.3: CN1.K 22.657,9.628 24.956,11.927 v1(24.956,12.736)
D0: CN1.21 U3.13 U10.11 U11.11 U12.11 U13.11 | length 117.6
  Top Layer w0.3: U13.11 48.471,15.197 48.471,16.566 48.76,16.855 48.76,23.604 49.41,24.254 49.41,31.359 48.26,32.509 U12.11 48.26,41.392 49.41,42.542 49.41,49.647 48.26,50.797 U11.11 48.26,58.061 49.41,59.211 49.41,67.935 48.26,69.085 U10.11 ; CN1.21 52.934,4.267 52.934,9.703 53.645,10.414 v1(54.61,10.414)
  Bottom Layer w0.3: U3.13 7.874,55.234 9.024,54.084 14.311,54.084 14.811,53.584 16.419,53.584 16.647,53.812 18.945,53.812 19.997,54.864 27.48,54.864 27.488,54.872 45.4,54.872 48.26,52.012 U11.11 ; U13.11 48.26,14.536 52.382,10.414 v1(54.61,10.414)
D1: CN1.20 U3.14 U10.12 U11.12 U12.12 U13.12 | length 129.6
  Top Layer w0.3: CN1.20 50.597,8.752 53.057,11.213 v1(54.567,11.213) ; U13.12 50.8,23.104 51.95,24.254 51.95,31.359 50.8,32.509 U12.12 50.8,41.392 51.95,42.542 51.95,49.647 50.8,50.797 U11.12 50.8,58.061 51.95,59.211 51.95,67.935 50.8,69.085 U10.12
  Bottom Layer w0.3: U3.14 5.334,55.234 6.984,53.584 14.103,53.584 14.603,53.084 16.626,53.084 16.854,53.312 19.153,53.312 20.197,54.356 27.679,54.356 27.695,54.372 44.986,54.372 46.99,52.368 46.99,47.708 47.784,46.914 48.736,46.914 49.644,47.821 49.644,49.956 50.8,51.112 U11.12 ; U13.12 50.8,14.536 54.066,11.27 54.51,11.27 v1(54.567,11.213)
D2: CN1.19 U3.11 U10.13 U11.13 U12.13 U13.13 | length 120.3
  Top Layer w0.3: CN1.19 48.057,8.601 48.854,9.398 50.535,9.398 53.367,12.229 v1(54.575,12.229) ; U13.13 53.34,23.104 54.49,24.254 54.49,31.359 53.34,32.509 U12.13 53.34,41.392 54.49,42.542 54.49,49.647 53.34,50.797 U11.13 53.34,58.061 54.49,59.211 54.49,67.935 53.34,69.085 U10.13
  Bottom Layer w0.3: U3.11 14.084,55.684 14.344,55.424 14.344,54.758 15.018,54.084 15.97,54.084 16.764,54.878 16.764,56.49 17.558,57.284 18.51,57.284 19.184,56.61 19.184,55.986 19.798,55.372 49.98,55.372 53.34,52.012 U11.13 ; U13.13 53.34,14.536 54.575,13.301 v1(54.575,12.229)
D3: CN1.18 U3.3 U10.15 U11.15 U12.15 U13.15 | length 154.5
  Top Layer w0.3: CN1.18 45.517,8.444 45.971,8.898 46.635,8.898 47.651,9.914 50.344,9.914 54.49,14.06 54.49,21.129 54.99,21.629 54.99,28.886 55.88,29.776 U13.15 55.88,30.676 54.73,31.826 54.73,39.331 55.88,40.481 U12.15 55.88,48.964 54.73,50.114 54.73,57.619 55.88,58.769 U11.15 55.88,67.252 54.73,68.402 54.73,75.907 55.88,77.057 U10.15
  Bottom Layer w0.3: U3.3 6.464,48.064 6.724,48.324 6.724,48.99 7.398,49.664 13.43,49.664 14.224,48.87 14.224,43.434 14.554,43.104 15.648,43.104 18.358,40.394 48.296,40.394 54.49,34.2 54.49,32.066 55.88,30.676 U13.15
D4: CN1.17 U3.6 U10.16 U11.16 U12.16 U13.16 | length 144
  Top Layer w0.3: CN1.17 42.977,8.43 43.945,9.398 46.428,9.398 47.444,10.414 49.101,10.414 52.07,13.383 52.07,21.345 52.45,21.725 52.45,28.886 53.34,29.776 U13.16 53.34,30.676 52.19,31.826 52.19,39.331 52.84,39.981 52.84,43.596 53.34,44.096 53.34,48.964 52.19,50.114 52.19,57.619 53.34,58.769 U11.16 53.34,67.252 52.19,68.402 52.19,75.907 53.34,77.057 U10.16
  Bottom Layer w0.3: U3.6 12.954,47.614 11.804,46.464 11.804,43.778 12.978,42.604 15.441,42.604 18.151,39.894 46.256,39.894 52.184,33.967 52.184,31.832 53.34,30.676 U13.16
D5: CN1.16 U10.17 U11.17 U12.17 U13.17 | length 90.5
  Top Layer w0.3: CN1.16 40.437,8.752 41.615,9.93 45.28,9.93 47.755,12.404 49.53,14.18 49.53,21.345 49.91,21.725 49.91,28.886 50.8,29.776 U13.17 50.8,30.676 49.65,31.826 49.65,39.331 50.3,39.981 50.3,43.596 50.8,44.096 50.8,48.964 49.65,50.114 49.65,57.619 50.8,58.769 U11.17 50.8,67.252 49.65,68.402 49.65,74.796 51.034,76.18 51.034,82.052 50.8,82.286 U10.17
D6: CN1.15 U10.18 U11.18 U12.18 U13.18 | length 90.8
  Top Layer w0.3: CN1.15 37.897,9.543 38.776,10.422 41.399,10.422 41.407,10.43 43.24,10.43 46.87,14.06 46.87,15.672 48.26,17.062 U13.18 48.26,30.676 47.11,31.826 47.11,39.331 47.76,39.981 47.76,43.596 48.26,44.096 48.26,48.964 47.11,50.114 47.11,57.619 48.26,58.769 U11.18 48.26,67.252 47.11,68.402 47.11,75.907 48.26,77.057 U10.18
D7: CN1.14 U4.11 U10.19 U11.19 U12.19 U13.19 | length 133.8
  Top Layer w0.3: CN1.14 35.357,9.459 36.819,10.922 41.192,10.922 44.33,14.06 44.33,15.672 45.72,17.062 U13.19 45.72,30.676 44.57,31.826 44.57,39.331 45.22,39.981 45.22,43.596 45.72,44.096 45.72,48.964 44.57,50.114 44.57,57.619 45.72,58.769 U11.19 45.72,67.252 44.57,68.402 44.57,75.907 45.72,77.057 U10.19
  Bottom Layer w0.3: U4.11 10.414,44.254 12.564,42.104 15.234,42.104 17.944,39.394 39.136,39.394 44.564,33.967 44.564,31.832 45.72,30.676 U13.19
EPROM_A13: U3.10 U10.26 U11.26 U12.26 U13.26 | length 75.9
  Top Layer w0.3: U13.26 27.94,30.676 26.79,31.826 26.79,40.536 29.09,42.836 29.09,45.434 27.94,46.584 27.94,48.964 26.79,50.114 26.79,52.488 26.869,52.568 26.869,59.317 29.09,61.537 29.09,63.722 27.94,64.872 27.94,67.252 26.79,68.402 26.79,81.756 27.94,82.906 U10.26
  Bottom Layer w0.3: U3.10 15.494,56.134 16.738,57.378 16.738,59.708 17.558,60.528 23.745,60.528 v1(26.869,57.404)
EPROM_A14: U4.12 U10.27 U11.27 U12.27 U13.27 | length 84.6
  Top Layer w0.3: U4.12 7.874,44.254 9.024,43.104 15.97,43.104 16.05,43.183 16.373,43.183 v1(16.431,43.241) ; U13.27 25.4,30.676 24.25,31.826 24.25,45.434 25.4,46.584 U12.27 25.4,48.964 24.25,50.114 24.25,63.722 25.4,64.872 U11.27 25.4,67.252 24.15,68.502 24.15,81.656 25.4,82.906 U10.27
  Bottom Layer w0.3: v1(16.431,43.241) 16.431,43.16 16.734,42.856 16.734,42.725 18.005,41.454 18.61,41.454 19.46,42.304 25.286,42.304 26.55,43.568 26.55,45.434 25.4,46.584 U12.27
EPROM_A15: J7.1 J8.2 U10.1 U11.1 U12.1 U13.1 | length 70
  Top Layer w0.3: v1(22.204,27.538) 22.86,26.882 U13.1 ; U12.1 22.86,44.751 24.01,45.901 24.01,49.44 23.51,49.94 23.51,50.912 U11.1 22.86,63.039 24.01,64.189 24.01,67.728 23.51,68.228 23.51,69.2 U10.1
  Bottom Layer w0.3: J8.2@15.587,50.588 J8.2 15.478,51.229 15.913,51.664 ; J7.1 18.022,51.664 15.913,51.664 ; v1(22.204,27.538) 22.204,27.619 22.572,27.987 22.572,28.438 21.71,29.3 21.71,31.674 22.86,32.824 U12.1 ; U11.1 22.86,52.012 22.21,52.662 19.844,52.662 19.694,52.812 17.061,52.812 15.913,51.664
EPROM_CS1: U2.9 U10.20 U10.22 | length 43.3
  Top Layer w0.3: v1(35.56,71.882) 36.71,71.882 38.1,73.272 U10.22 39.23,85.09 39.49,85.35 39.49,86.016 40.164,86.69 41.116,86.69 41.79,86.016 41.79,85.35 42.05,85.09 U10.20
  Bottom Layer w0.3: U2.9 18.034,66.998 20.099,69.063 20.099,69.634 22.971,72.506 24.005,72.506 24.355,72.156 30.998,72.156 31.348,72.506 34.936,72.506 v1(35.56,71.882)
EPROM_CS2: U2.10 U11.20 U11.22 | length 46.1
  Bottom Layer w0.3: U2.10 15.494,69.918 16.701,71.125 16.701,73.095 18.028,74.422 24.121,74.422 24.355,74.656 37.91,74.656 42.024,70.543 42.024,68.408 43.18,67.252 U11.20 42.05,66.802 41.79,66.542 41.79,65.876 41.116,65.202 40.164,65.202 39.49,65.876 39.49,66.542 39.23,66.802 U11.22
EPROM_CS3: U2.11 U12.20 U12.22 | length 54.2
  Top Layer w0.3: U2.11 12.954,66.098 14.104,64.948 17.636,64.948 18.068,64.516 v1(18.095,64.516) ; v1(42.614,62.096) 42.614,56.513 42.03,55.929 42.03,50.429 43.18,49.279 U12.20
  Bottom Layer w0.3: v1(18.095,64.516) 21.081,61.53 28.416,61.53 28.992,62.106 42.605,62.106 v1(42.614,62.096) ; U12.22 39.23,48.514 39.49,48.254 39.49,47.588 40.164,46.914 41.116,46.914 41.79,47.588 41.79,48.254 42.05,48.514 U12.20 U12.20@43.18,48.964
EPROM_CS4: U2.12 U13.20 U13.22 | length 68.6
  Top Layer w0.3: U2.12 10.414,66.098 12.496,64.016 14.701,64.016 14.947,64.262 v1(17.234,64.262) ; v1(37.45,53.722) 37.506,53.778 37.506,57.532 v1(37.612,57.638) ; v1(37.534,46.482) 37.534,39.622 36.95,39.038 36.95,32.141 38.1,30.991 U13.22
  Bottom Layer w0.3: v1(17.234,64.262) 18.616,62.88 18.616,62.792 20.378,61.03 28.623,61.03 29.061,61.468 35.56,61.468 37.534,59.494 v1@37.534,57.638 ; v1(37.45,53.722) 37.45,53.002 36.95,52.502 36.95,47.066 v1(37.534,46.482) ; U13.22 39.23,30.226 39.49,29.966 39.49,29.3 40.164,28.626 41.116,28.626 41.79,29.3 41.79,29.966 42.05,30.226 U13.20
GND: C1.1 C2.1 C3.1 C4.1 C5.1 C6.1 C7.1 C8.1 C10.1 C11.1 C12.1 C13.1 CN1.1 CN1.22 CN1.A CN1.Z CP1.2 J3.1 J4.1 J5.1 J6.1 Q1.3 R5.1 SW1.1 U1.7 U2.8 U3.8 U4.7 U5.7 U6.7 U10.14 U11.14 U12.14 U13.14 | length 415.2
  Top Layer w1: CN1.1 v3(2.337,8.636) ; C7.1 4.119,85.091 2.866,86.343 SW1.1 4.644,88.392 11.714,88.392 13.164,86.942 13.164,86.462 13.208,86.418 13.208,83.054 C1.1 ; C3.1 14.732,51.816 U3.8@18.034,48.514 ; C2.1 5.9,62.449 6.934,61.414 6.934,61.138 16.274,61.138 U2.8@18.034,59.378 ; v3(9.349,31.979) 11.618,29.71 15.225,29.71 17.494,27.44 17.494,27.314 18.034,26.774 18.034,25.874 18.311,25.597 18.584,25.597 20.043,24.138 20.043,17.69 18.239,15.886 18.239,15.436 U6.7 ; U1.7 11.664,70.612 13.218,69.058 16.294,69.058 18.095,69.058 19.534,67.619 19.534,60.878 ; U4.7 18.034,37.534 19.812,39.312 v3(19.812,41.454) v3(19.812,44.958) ; U3.8 U3.8@18.034,48.514 ; U2.8 18.23,59.124 18.23,59.574 19.534,60.878 ; v3(26.296,41.244) 27.94,42.888 C12.1 ; CN1.22 55.677,8.891 v3(55.778,8.993) ; U3.8@18.034,48.514 18.034,53.113 19.534,54.613 19.534,60.878
  Bottom Layer w1: CN1.A v3(2.337,8.636) 2.337,10.995 1.016,12.316 1.016,16.248 1.303,16.535 1.303,16.78 3.573,19.05 5.366,19.05 ; J5.1 5.366,17.752 5.366,19.05 ; J4.1 5.366,19.05 ; Q1.3@8.051,73.329 Q1.3 ; C5.1 8.247,30.136 9.349,31.238 v3(9.349,31.979) ; C4.1@8.674,41.021 8.763,40.932 11.94,40.932 13.62,39.252 16.316,39.252 18.034,37.534 U4.7 18.034,36.634 19.534,35.134 19.534,31.68 18.034,30.18 U5.7 ; 10.036,70.046 10.602,70.612 U1.7 11.664,70.612 12.311,71.259 13.325,72.273 13.325,79.399 13.664,79.738 13.664,80.207 13.911,80.454 14.002,80.454 14.824,81.276 C1.1 ; 12.392,71.178 R5.1 ; J6.1 12.979,17.745 12.979,19.05 ; J3.1 12.979,19.05 ; U3.8 18.034,47.614 19.812,45.836 v3(19.812,44.958) ; U6.7 18.043,15.69 14.683,19.05 12.979,19.05 ; v3(19.812,41.454) 26.086,41.454 v3(26.296,41.244) ; C13.1 36.12,26.162 36.628,26.67 44.646,26.67 U13.14@55.88,15.436 ; C12.1 36.384,44.482 36.757,44.854 45.038,44.854 55.34,34.552 55.34,34.426 55.88,33.886 U12.14 59.327,33.274 ; C11.1 28.102,62.68 28.518,63.096 44.796,63.096 55.684,52.208 55.684,51.758 U11.14 59.327,51.562 ; 38.378,81.534 39.978,83.134 ; 50.447,83.134 55.88,77.701 U10.14 55.88,69.4 59.327,65.953 59.327,51.562 ; CN1.Z 55.778,4.166 v3(55.778,8.993) 55.778,14.884 U13.14 U13.14@55.88,15.436 ; 5.366,19.05 5.753,19.05 6.12,19.417 6.12,19.671 6.999,20.55 8.66,20.55 C6.1 12.979,19.05 ; U13.14@55.88,15.436 55.88,24.747 59.327,28.194 59.327,33.274 ; 59.327,33.274 59.327,51.562
  other v2: 16.129,8.407 23.851,8.534 26.391,8.738 9.855,8.915 13.564,9.246 18.288,9.957 24.834,10.559 4.242,12.04 19.761,12.294 22.06,12.453 26.05,12.58 20.373,14.986 20.269,21.971 2.464,29.87 0.94,35.509 6.604,68.007 16.294,68.926 38.163,72.019 36.982,73.787 21.117,75.692 30.48,76.073 28.194,76.2 39.328,76.81 36.855,77.1 34.12,77.375 21.057,84.176
NetC7_2: C7.2 R2.2 SW1.2 U1.5 U1.12 U1.13 U3.1 | length 86.2
  Top Layer w0.3: v1(5.817,68.555) 6.585,69.323 6.585,70.84 7.583,71.837 8.044,71.837 9.539,73.332 9.539,74.467 10.764,75.692 U1.5 ; SW1.2 7.366,85.463 6.659,84.756 C7.2 8.708,79.269 8.708,78.662 10.288,77.082 10.895,77.082 11.214,76.763 U1.5 ; U1.12 18.384,80.772 16.736,79.124 16.736,78.073 14.355,75.692 U1.5
  Bottom Layer w0.3: U3.1 0.254,53.608 -0.896,54.758 -0.896,63.322 1.404,65.622 1.404,67.234 2.724,68.555 v1(5.817,68.555) ; U1.13 U1.12 19.284,80.772 21.824,78.232 R2.2
NetC8_2: C8.2 U4.5 U5.8 | length 11.5
  Top Layer w0.3: U4.5 12.954,37.534 14.478,39.058 C8.2
  Bottom Layer w0.3: U4.5 14.084,37.084 14.344,36.824 14.344,36.158 15.12,35.382 16.884,35.382 18.034,34.232 U5.8
NetCP1_1: CP1.1 R1.2 U1.1 | length 60.1
  Bottom Layer w0.3: CP1.1 3.818,70.98 3.818,76.403 4.538,77.123 4.538,77.927 6.363,79.752 7.461,79.752 7.466,79.746 7.715,79.746 8.487,80.518 8.884,80.518 10.484,82.118 12.096,82.118 12.814,82.836 12.814,83.788 12.14,84.462 11.474,84.462 11.214,84.722 U1.1 15.126,85.852 16.93,87.655 40.869,87.655 41.834,86.69 41.834,84.101 42.164,83.771 R1.2
NetD1_1: D1.1 R3.1 U1.8 U2.15 | length 34.2
  Top Layer w0.3: U1.8@18.384,70.612 U1.8
  Bottom Layer w0.3: U2.15 2.794,66.098 4.424,64.468 5.669,64.468 7.05,63.087 7.05,62.36 7.922,61.488 11.163,61.488 12.555,62.88 12.555,62.904 12.939,63.288 14.021,63.288 14.571,62.738 R3.1 16.06,64.897 16.884,65.721 16.884,67.474 18.834,69.424 U1.8 19.284,70.612 22.078,73.406 D1.1
NetD2_1: D2.1 R5.2 | length 17.6
  Top Layer w0.3: v1(9.178,81.884) 9.216,81.922 12.14,81.922 13.336,80.726 13.336,80.448 R5.2
  Bottom Layer w0.3: D2.1 5.512,79.89 5.512,80.838 5.509,80.842 5.509,81.794 6.183,82.468 8.594,82.468 v1(9.178,81.884)
NetD2_2: D2.2 Q2.1 | length 4.3
  Top Layer w0.3: D2.2 2.559,74.4 5.588,77.429 Q2.1
NetJ1_2: J1.2 J2.2 U4.1 | length 3
  Bottom Layer w0.3: J1.2 1.353,37.084 U4.1
NetJ3_2: J3.2 U6.10
NetJ4_2: J4.2 U6.13
NetJ5_2: J5.2 U6.2
NetJ6_2: J6.2 U6.5
NetJ8_1: J8.1 U3.7
NetQ1_2: Q1.2 R4.2 | length 27.4
  Bottom Layer w0.3: Q1.2 9.614,77.432 9.614,78.708 10.34,79.434 11.214,79.434 11.402,79.622 12.14,79.622 12.814,80.296 12.814,81.026 14.214,82.426 15.758,82.426 16.673,81.512 16.673,78.317 17.908,77.082 24.518,77.082 R4.2
NetQ2_2: Q2.2 R3.2 | length 19.5
  Bottom Layer w0.3: Q2.2 6.858,76.447 4.538,74.127 4.538,71.3 7.69,68.148 8.35,68.148 9.144,67.354 9.144,65.423 8.44,64.719 R3.2
NetR4_1: R4.1 U1.11 | length 15
  Bottom Layer w0.3: U1.11 21.117,78.232 21.617,77.732 31.488,77.732 R4.1
NetU1_2: U1.2 U1.6 U1.10 | length 27.3
  Top Layer w0.3: U1.6 15.844,73.152 18.384,75.692 U1.10 18.834,76.822 19.094,77.082 19.76,77.082 20.434,77.756 20.434,81.248 19.545,82.138 17.332,82.138 16.397,81.203 16.397,81.061 15.462,80.126 14.51,80.126 13.836,80.8 13.836,81.14 11.664,83.312 U1.2
NetU1_3: U1.3 U1.4 | length 2.5
  Top Layer w0.3: U1.4 U1.3
NetU1_9: U1.9 U4.8 | length 30.6
  Top Layer w0.3: U4.8 18.034,45.154 20.51,47.63 20.51,71.012 19.76,71.762 19.094,71.762 18.834,72.022 U1.9
NetU2_3: U2.3 U3.15 | length 4.3
  Bottom Layer w0.3: U3.15 2.794,56.036 5.334,58.576 U2.3
NetU2_13: U2.13 U3.12 | length 15.5
  Top Layer w0.3: U2.13 7.874,66.098 11.484,62.488 12.23,62.488 12.38,62.638 v1(13.208,62.638)
  Bottom Layer w0.3: U3.12 10.414,56.134 11.804,57.524 11.804,60.826 12.776,61.798 12.776,62.179 13.208,62.612 v1(13.208,62.638)
NetU3_2: U3.2 U4.13 | length 4.4
  Bottom Layer w0.3: U3.2 2.794,47.654 5.334,45.114 U4.13
NetU3_4: U3.4 U4.10 | length 6.9
  Top Layer w0.3: U3.4 9.004,48.064 9.264,47.804 9.264,47.138 10.098,46.304 11.467,46.304 12.954,44.817 U4.10
NetU3_5: U3.5 U4.9 | length 7.1
  Top Layer w0.3: U3.5 10.414,47.614 11.224,46.804 12.138,46.804 12.478,46.464 13.27,46.464 14.104,45.63 14.104,44.964 14.364,44.704 U4.9
NetU3_9: U3.9 U4.6 | length 21.7
  Top Layer w0.3: U4.6 15.494,37.534 18.358,40.398 18.358,42.058 v1(18.312,42.104) ; v1(17.034,50.928) 16.002,51.96 16.002,53.202 18.034,55.234 U3.9
  Bottom Layer w0.3: v1(17.034,50.928) 17.034,49.14 16.884,48.99 16.884,43.778 17.592,43.069 17.592,42.87 18.312,42.15 v1(18.312,42.104)
NetU4_2: U4.2 U5.13 | length 3.3
  Top Layer w0.3: U5.13 U4.2
NetU4_4: U4.4 U5.10 | length 4.4
  Top Layer w0.3: U4.4 10.414,36.703 12.954,34.163 U5.10
NetU5_1: U5.1 U5.6 | length 14.4
  Bottom Layer w0.3: U5.1 3.405,26.773 3.868,26.773 4.858,27.762 13.43,27.762 14.104,27.088 14.104,26.422 14.364,26.162 U5.6
NetU5_2: U5.2 U6.3 | length 12.9
  Top Layer w0.3: U5.2 5.334,24.636 5.51,24.46 5.819,24.46 6.613,23.666 6.613,22.054 8.77,19.896 8.77,18.537 7.883,17.65 U6.3
NetU5_3: U5.3 U6.11 | length 4.4
  Top Layer w0.3: U5.3 7.874,25.785 10.423,23.237 U6.11
NetU5_4: U5.4 U6.6 | length 14.1
  Top Layer w0.3: U5.4 10.414,25.712 11.564,24.562 13.337,24.562 14.353,23.546 14.353,21.934 15.503,20.784 U6.6
NetU5_5: U5.5 U6.8 | length 7.1
  Top Layer w0.3: U5.5 12.954,25.712 14.104,24.562 15.877,24.562 16.653,23.786 16.653,23.12 16.913,22.86 U6.8
NetU5_11: U5.11 U5.12 | length 2.5
  Bottom Layer w0.3: U5.12 U5.11
Phi2: CN1.E U5.9 | length 37.1
  Bottom Layer w0.3: CN1.E 12.497,6.564 19.558,13.625 19.558,17.378 15.676,21.26 15.026,21.26 14.353,21.934 14.353,23.786 15.077,24.511 15.919,24.511 16.644,25.236 16.644,27.506 15.494,28.656 U5.9
R/\W\: CN1.5 U4.3 | length 36.2
  Top Layer w0.3: U4.3 7.874,36.634 9.024,35.484 9.024,32.856 8.499,32.331 8.499,31.464 9.397,30.566 9.397,27.967 9.264,27.834 9.264,25.236 10.04,24.46 10.899,24.46 11.684,23.675 11.684,22.062 12.073,21.674 12.073,18.124 11.813,17.864 11.813,14.314 12.497,13.63 CN1.5
VCC: C1.2 C2.2 C3.2 C4.2 C5.2 C6.2 C10.2 C11.2 C12.2 C13.2 CN1.2 CN1.3 J7.2 Q2.3 R1.1 R2.1 U1.14 U2.16 U3.16 U4.14 U5.14 U6.14 U10.28 U11.28 U12.28 U13.28 | length 289